# Altium PCB Electrode_PCB.PcbDoc
Units mil, origin at the board's own origin, x right, y up, seen from the top; angles counter-clockwise.
Board outline 510.49 x 1258.83 mil, 2 copper layers (Top Layer, Bottom Layer), stack 34 mil thick; 20 components, 19 nets, 78 pads, 13 vias.
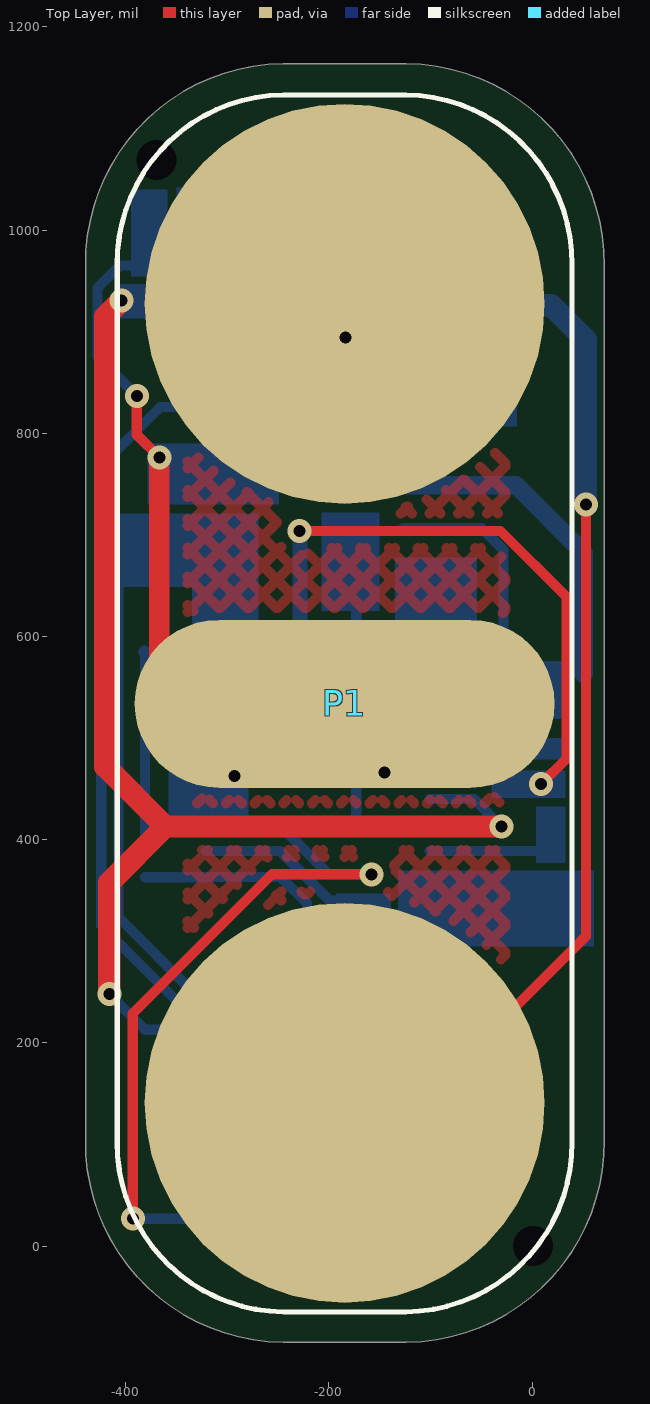
[diagram p0: Top Layer view]
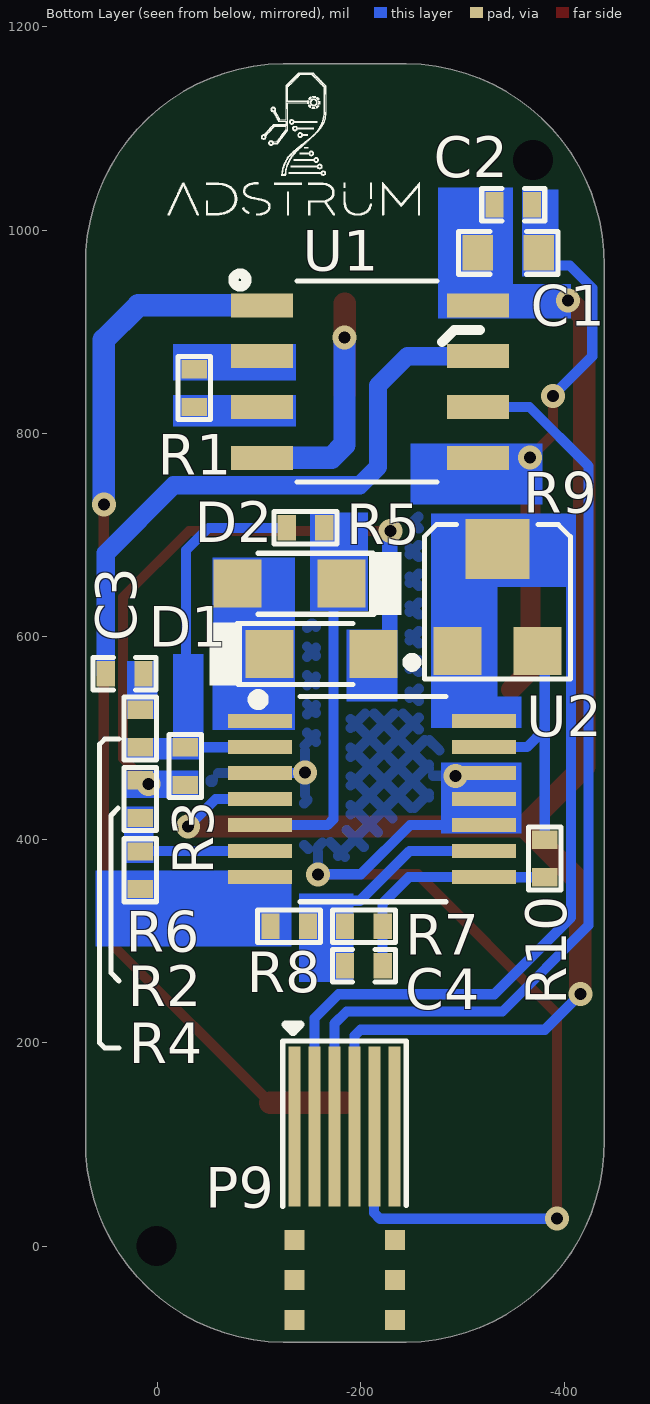
[diagram p1: Bottom Layer view, seen from below]
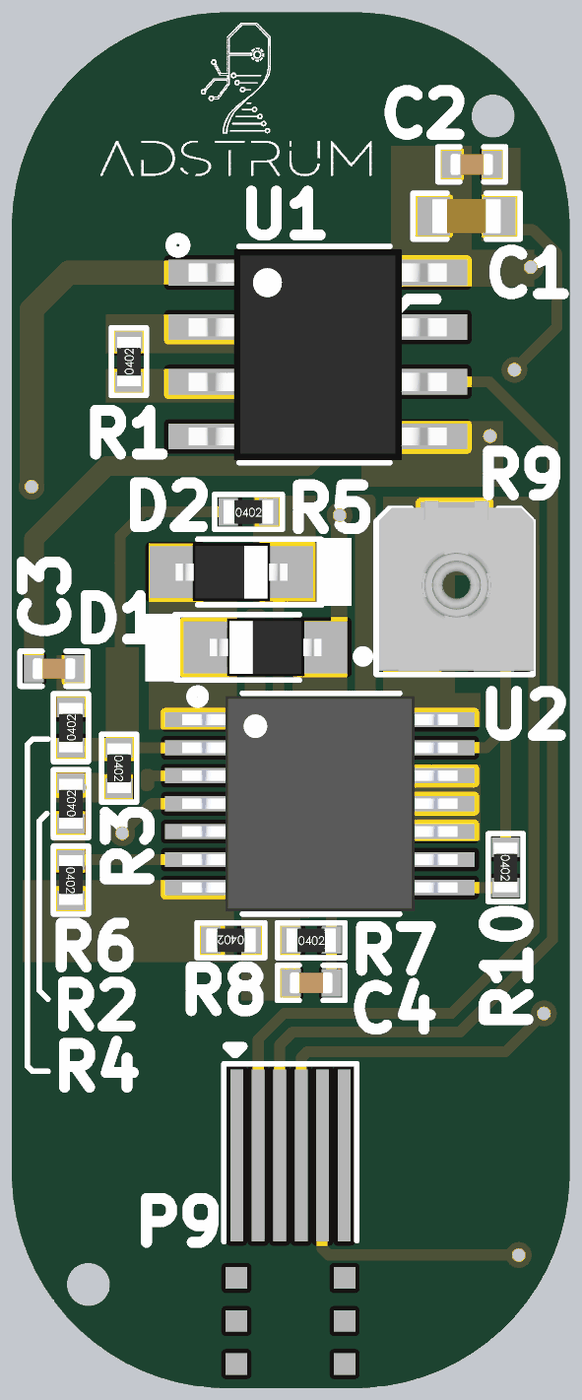
[diagram p2: 3D render of the assembled board from below, using the file's embedded part models]

## Layer stack, top to bottom
Top Solder: solder mask 3, Solder Resist, Dk 3.5
Top Layer: signal copper 9
Dielectric 1: dielectric 16, FR-4, Dk 4.8
Bottom Layer: signal copper 9
Bottom Solder: solder mask 3, Solder Resist, Dk 3.5

## Board outline
-439.51,104.27 ccw(c-242.67,102.06) -244.88,-94.78 -123.65,-94.78 ccw(c-125.86,102.06) 70.98,104.27 70.98,965 ccw(c-125.86,967.21) -123.65,1164.05 -244.88,1164.05 ccw(c-242.67,967.21) -439.51,965

## Design rules (kind name [scope] priority, off if disabled: settings)
Clearance [All] p1: gap=7 ignorepadtopadclearanceinfootprint=FALSE except(0: Arc-Hole Track-Hole SMDPad-Hole THPad-Hole Via-Hole Fill-Hole Poly-Hole Region-Hole Text-Hole; 4: Arc-SMDPad Track-SMDPad SMDPad-SMDPad)
HoleSize [All] p1: absolutevalues=TRUE maxlimit=1000 minlimit=1 maxpercent=80.000 minpercent=20.000
HoleToHoleClearance [All] p1: gap=0 allowstackedmicrovias=TRUE
MinimumSolderMaskSliver [All] p1: minsoldermaskwidth=0
PolygonConnect [All] p1: connectstyle=Relief reliefconductorwidth=10 reliefentries=4 polygonreliefangle="90 Angle" airgapwidth=10
RoutingVias [All] p1: holewidth=11.81 width=23.62 viastyle="Through Hole" minholewidth=11.81 minwidth=23.62 maxholewidth=31.5 maxwidth=62.99
SilkToSilkClearance [All] p1: silktosilkclearance=0
SilkToSolderMaskClearance [IsPad] p1: minsilkscreentomaskgap=0 clearancetoexposedcopper=TRUE
SolderMaskExpansion [All] p1: expansion=4 istentingtop=FALSE
Width [All] p1: maxlimit=40 minlimit=10 preferedwidth=22
25 further rules are at their usual default settings.

## Components (designator, comment, footprint, x,y, rotation, side; value= is the part's Value field where it differs from the comment)
C1 "10uF'" Cap0603 -345.24,977.63 r180 bottom
C2 "0.1uF" "Cap 0402" -350,1025 r180 bottom
C3 "10nF" "Cap 0402" 32.5,563.5 r180 bottom
C4 "1uF" "Cap 0402" -203,276 r0 bottom
D1 "1N4148WS" SOD-323 -161.18,583 r180 bottom
D2 "1N4148WS" SOD-323 -129.98,652 r0 bottom
P1 "sEMG sensor" "sEMG sensor" -184.51,534.27 r0 top locked
P9 "6 pin Ribbon Pads" "6 pin Ribbon Pads." -183.95,118 r0 bottom
R1 "240R" Res0402 -36,844.5 r90 bottom
R2 "150K" Res0402 17,440 r90 bottom
R3 "150K" Res0402 -27,472.5 r270 bottom
R4 "150K" Res0402 17,509.5 r90 bottom
R5 "150K" Res0402 -145.5,707 r180 bottom
R6 "150K" Res0402 17,370 r270 bottom
R7 "80.6K" Res0402 -203,315 r180 bottom
R8 "80.6K" Res0402 -129.5,315 r0 bottom
R9 "TC33X-2-104E" TC33X-2-104E -295,586 r180 bottom
R10 "1K" Res0402 -381,381.5 r270 bottom
U1 "AD8221ARZ-R7" SOIC-8 -209,851 r180 bottom
U2 "TL084CPWR" 14TSSOP -211,440 r180 bottom locked

## Footprints (in the part's own frame and the unit in brackets; to place one, negate y for a bottom-side part, rotate by r counter-clockwise, add the part's x,y. Pads: shape width x height; smd on the part's side, far side on the other; paste and mask are expansions set on the pad)
"6 pin Ribbon Pads." [mm]
  rect 0.3x4 smd: 1(1.25,0) 2(0.75,0) 3(0.25,0) 4(-0.25,0) 5(-0.75,0) 6(-1.25,0)
  silkscreen extent -1.54,-2.54 1.54,2.01
14TSSOP [mm]
  rect 1.6x0.35 smd: 1(-2.8,1.95) 2(-2.8,1.3) 3(-2.8,0.65) 4(-2.8,0) 5(-2.8,-0.65) 6(-2.8,-1.3) 7(-2.8,-1.95) 8(2.8,-1.95) 9(2.8,-1.3) 10(2.8,-0.65) 11(2.8,0) 12(2.8,0.65) 13(2.8,1.3) 14(2.8,1.95)
  silkscreen extent -2.98,-2.57 1.85,2.63, body extent -3.2,-2.5 3.2,2.5, height 1.2
Cap0603 [mil]
  rect 30x35 smd mask+2.36: 1(-30,0) 2(30,0)
  silkscreen extent -49,-21 49,21, body extent -32,-16 31,16, height 34
"Cap 0402" [mil]
  rect 18x25 smd mask+2.36: 1(-18.5,0) 2(18.5,0)
  silkscreen extent -31,-16 31,16, body extent -20,-10 20,10, height 19
Res0402 [mil]
  rect 18x25 smd mask+4: 1(-18.5,0) 2(18.5,0)
  silkscreen extent -32,-17 32,16, body extent -23,-11 23,11, height 16
"sEMG sensor" [mm]
  round 10 smd: 1(0,9.987) 2(0,-9.987)
  oval 10.5x4.2 smd: 3(0,-0.013)
  silkscreen extent -5.68,-15.21 5.68,15.21
SOD-323 [mm]
  rect 1.2x1.2 smd: 1(-1.3,0) 2(1.3,0)
  silkscreen extent -2.79,-0.79 0.79,0.79, body extent -1.3,-0.67 1.3,0.67, height 1.1
SOIC-8 [mm]
  rect 1.55x0.6 smd: 1(-2.7,1.905) 2(-2.7,0.635) 3(-2.7,-0.635) 4(-2.7,-1.905) 5(2.7,-1.905) 6(2.7,-0.635) 7(2.7,0.635) 8(2.7,1.905)
  silkscreen extent -3.41,-2.51 1.68,2.7, body extent -3,-2.45 3,2.45, height 1.7
TC33X-2-104E [mm]
  rect 1.2x1.2 smd: 1(0,0) 3(2,0)
  rect 1.6x1.5 smd: 2(1,2.55)
  silkscreen extent -1.24,-0.71 2.83,3.15, body extent -0.76,-0.64 2.84,3.32, height 1.13

## Part data
C1: library part CL10A106MA8NRNC, "CAP CER 10UF 25V X5R 0603", Capacitance=10uF, Case Code (Imperial)=0603, Case Code (Metric)=1608, Dielectric=X5R, Manufacturer=Samsung, Max Operating Temperature=85°C, Min Operating Temperature=-55°C, Package Quantity=1, Tolerance=20%, Voltage Rating=25V, Case/Package=0603, Category="Ceramic Capacitors", ComponentLink1Description=https://datasheet.ciiva.com/25766/cl10a106ma8nrnc-25766562.pdf?src-supplier=Digi-Key, ComponentLink1URL=https://datasheet.ciiva.com/25766/cl10a106ma8nrnc-25766562.pdf?src-supplier=Digi-Key, Construction=Flat, Contact Plating=Tin, Lead Free="Lead Free", Length=0.063inch, Manufacturer Part Number=CL10A106MA8NRNC, Mount="Surface Mount", Packaging="Tape and Reel", Pricing 1="4000=0.03753, 8000=0.03700, 16000=0.03595, 24000=0.03515, 32000=0.03383, 40000=0.03304, 400000=0.03225 (USD)", RoHS=Yes, RoHS Compliant=Yes, Series=CL, Supplier 1=Avnet, Supplier Part Number 1=CL10A106MA8NRNC, Termination=Wraparound, Thickness=0.035inch, Width=0.031inch
C2: library part GRM155R71H104ME14D, "CAP CER 0.1UF 50V X7R 0402", Capacitance=100nF, Case/Package=0402, Manufacturer=Murata, Max Operating Temperature=125°C, Min Operating Temperature=-55°C, Supplier Part Number 1=490-10701-1-ND, Tolerance=20%, Voltage Rating=50V, ComponentLink1Description=http://search.murata.co.jp/Ceramy/image/img/A01X/G101/ENG/GRM155R71H104ME14-01.pdf?src-supplier=Digi-Key, ComponentLink1URL=http://search.murata.co.jp/Ceramy/image/img/A01X/G101/ENG/GRM155R71H104ME14-01.pdf?src-supplier=Digi-Key, ComponentLink2Description=http://psearch.en.murata.com/capacitor/product/GRM155R71H104ME14%23.pdf?src-supplier=Avnet, ComponentLink2URL=http://psearch.en.murata.com/capacitor/product/GRM155R71H104ME14%23.pdf?src-supplier=Avnet, ComponentLink3Description=http://components.arrow.com/part/dataview/0323_07177683?src-supplier=Arrow+Europe, ComponentLink3URL=http://components.arrow.com/part/dataview/0323_07177683?src-supplier=Arrow+Europe, ComponentLink4Description=http://www.mouser.com/ds/2/281/c02e-2905.pdf?src-supplier=Mouser, ComponentLink4URL=http://www.mouser.com/ds/2/281/c02e-2905.pdf?src-supplier=Mouser, Length=0.039inch, Manufacturer Part Number=GRM155R71H104ME14D, Mount="Surface Mount", Packaging="Cut Tape", Pricing 1="1=0.1, 10=0.038, 100=0.0168, 500=0.01198, 1000=0.00941, 2500=0.00855, 5000=0.00787 (USD)", Stock 1=439844, Supplier 1=Digi-Key, Thickness=0.022inch, Width=0.02inch
C3: library part CC0402KRX7R9BB103, "CAP CER 10nF 50V 0402 SMD", Supplier 1="Arrow Electronics", Supplier Part Number 1=CC0402KRX7R9BB103
C4: library part CC0402KRX5R7BB105, "CAP CER 1UF 16V X5R 0402", Case Code (Imperial)=0402, Case Code (Metric)=1005, Dielectric=X5R, Manufacturer=Yageo, Max Operating Temperature=85°C, Min Operating Temperature=-55°C, Supplier Part Number 1=311-1691-6-ND, Tolerance=10%, Voltage Rating=16V, Capacitance=1uF, Case/Package=0402, ComponentLink1Description=http://www.yageo.com/documents/recent/UPY-GPHC_X5R_4V-to-50V_12.pdf?src-supplier=Avnet+Europe, ComponentLink1URL=http://www.yageo.com/documents/recent/UPY-GPHC_X5R_4V-to-50V_12.pdf?src-supplier=Avnet+Europe, Composition=Ceramic, Depth=0.5mm, Halogen Free="Halogen Free", Height=0.5mm, Lead Free="Lead Free", Length=1mm, Manufacturer Part Number=CC0402KRX5R7BB105, Mount="Surface Mount", Packaging="Tape and Reel", Pricing 1="1=0.36, 10=0.252, 100=0.1512, 500=0.1134, 1000=0.09576, 2500=0.09072, 5000=0.08568 (USD)", Radiation Hardening=No, Stock 1=1405667, Supplier 1=Digi-Key, Termination=SMD/SMT, Thickness=0.022inch, Voltage Rating (DC)=16V, Weight=2.3E-05oz, Width=0.02inch
D1 D2: "100V -55℃~+150℃@(Tj) 400mW Single 1.25V@150mA 4ns 1μA@75V 200mA SOD-323 Switching Diode ROHS", Manufacturer=YFW, ComponentLink1Description=LCSC, ComponentLink1URL=https://lcsc.com/product-detail/Switching-Diode_YFW-1N4148WS_C1884546.html, Manufacturer Part Number=1N4148WS
P1: "Sensor Connecting Pads"
P9: "Ribbon wire Connection Pads"
R1: library part RC0402FR-07240RL, "RES SMD 0402 240 Ohm 1% 1/16W ±100ppm/°C Molded SMD Paper T/R", Case Code (Imperial)=0402, Case Code (Metric)=1005, Manufacturer=Yageo, Max Operating Temperature=155°C, Max Power Dissipation=63mW, Min Operating Temperature=-55°C, Package Quantity=1, Resistance Tolerance=1%, Resistor Type="Thick Film", Temperature Coefficient=100ppm/°C, Voltage Rating=50V, Case/Package=0402, Category="Chip SMD Resistors", ComponentLink1Description=https://datasheet.ciiva.com/7849/1018594-7849915.pdf?src-supplier=Element14, ComponentLink1URL=https://datasheet.ciiva.com/7849/1018594-7849915.pdf?src-supplier=Element14, ComponentLink2Description=https://datasheet.ciiva.com/7849/1018594-7849916.pdf?src-supplier=Element14, ComponentLink2URL=https://datasheet.ciiva.com/7849/1018594-7849916.pdf?src-supplier=Element14, ComponentLink3Description=https://datasheet.ciiva.com/2519/pyu-r-int-thick-7-2519157.pdf?src-supplier=Digi-Key, ComponentLink3URL=https://datasheet.ciiva.com/2519/pyu-r-int-thick-7-2519157.pdf?src-supplier=Digi-Key, ComponentLink4Description=https://datasheet.ciiva.com/2519/pyu-r-int-thick-7-2519158.pdf?src-supplier=Digi-Key, ComponentLink4URL=https://datasheet.ciiva.com/2519/pyu-r-int-thick-7-2519158.pdf?src-supplier=Digi-Key, ComponentLink5Description=https://datasheet.ciiva.com/2519/pyu-r-int-thick-7-2519156.pdf?src-supplier=Digi-Key, ComponentLink5URL=https://datasheet.ciiva.com/2519/pyu-r-int-thick-7-2519156.pdf?src-supplier=Digi-Key, ComponentLink6Description=https://datasheet.ciiva.com/12669/pyu-rc0402-51-rohs-l-6-r-12669689.pdf?src-supplier=Mouser, ComponentLink6URL=https://datasheet.ciiva.com/12669/pyu-rc0402-51-rohs-l-6-r-12669689.pdf?src-supplier=Mouser, ComponentLink7Description=https://datasheet.ciiva.com/17419/pyu-rc0402-51-rohs-l-6-r-17419482.pdf?src-supplier=Future+Electronics, ComponentLink7URL=https://datasheet.ciiva.com/17419/pyu-rc0402-51-rohs-l-6-r-17419482.pdf?src-supplier=Future+Electronics, Construction=Rectangular, Depth=0.5mm, Features="Moisture Resistant", Height=0.016inch, Lead Free="Lead Free", Length=1mm, Manufacturer Part Number=RC0402FR-07240RL, Military Standard=Not, Number of Terminations=2, Packaging="Tape and Reel", Power Rating=63mW, Pricing 1="10000=0.00190 (USD)", REACH SVHC=Unknown, Resistance=240R, RoHS=Yes, RoHS Compliant=Yes, Series=RC, Size Code=0402, Stock 1=3138480, Supplier 1="Arrow Electronics", Supplier Part Number 1=RC0402FR-07240RL, Termination=SMD/SMT, Tolerance=1%, Voltage Rating (DC)=50V, Width=0.02inch
R2 R3 R4 R5 R6: library part RC0402JR-07150KL, "RES SMD 0402 150kOhm 5% Paper T/R", Case Code (Imperial)=0402, Case Code (Metric)=1005, Manufacturer=Yageo, Max Operating Temperature=155°C, Max Power Dissipation=63mW, Min Operating Temperature=-55°C, Package Quantity=1, Resistance=150kR, Resistance Tolerance=5%, Resistor Type="Thick Film", Temperature Coefficient=100ppm/°C, Voltage Rating=50V, Case/Package=0402, Category="Chip SMD Resistors", ComponentLink1Description=https://datasheet.ciiva.com/7983/1018594-7983551.pdf?src-supplier=Element14, ComponentLink1URL=https://datasheet.ciiva.com/7983/1018594-7983551.pdf?src-supplier=Element14, ComponentLink2Description=https://datasheet.ciiva.com/2518/pyu-r-int-thick-7-2518929.pdf?src-supplier=Digi-Key, ComponentLink2URL=https://datasheet.ciiva.com/2518/pyu-r-int-thick-7-2518929.pdf?src-supplier=Digi-Key, ComponentLink3Description=https://datasheet.ciiva.com/2518/pyu-r-int-thick-7-2518930.pdf?src-supplier=Digi-Key, ComponentLink3URL=https://datasheet.ciiva.com/2518/pyu-r-int-thick-7-2518930.pdf?src-supplier=Digi-Key, ComponentLink4Description=https://datasheet.ciiva.com/2518/pyu-r-int-thick-7-2518928.pdf?src-supplier=Digi-Key, ComponentLink4URL=https://datasheet.ciiva.com/2518/pyu-r-int-thick-7-2518928.pdf?src-supplier=Digi-Key, ComponentLink5Description=https://datasheet.ciiva.com/7850/1018594-7850149.pdf?src-supplier=Element14, ComponentLink5URL=https://datasheet.ciiva.com/7850/1018594-7850149.pdf?src-supplier=Element14, ComponentLink6Description=https://datasheet.ciiva.com/17072/pyu-rc0402-51-rohs-l-6-r-17072379.pdf?src-supplier=Future+Electronics, ComponentLink6URL=https://datasheet.ciiva.com/17072/pyu-rc0402-51-rohs-l-6-r-17072379.pdf?src-supplier=Future+Electronics, ComponentLink7Description=https://datasheet.ciiva.com/15189/getdatasheetpartid-251830-15189543.pdf?src-supplier=Verical, ComponentLink7URL=https://datasheet.ciiva.com/15189/getdatasheetpartid-251830-15189543.pdf?src-supplier=Verical, Construction=Rectangular, Depth=0.5mm, Features="Moisture Resistant", Height=0.016inch, Lead Free="Lead Free", Length=1mm, Manufacturer Part Number=RC0402JR-07150KL, Military Standard=Not, Number of Terminations=2, Packaging="Tape and Reel", Power Rating=63mW, Pricing 1="10000=0.00100 (USD)", REACH SVHC="No SVHC", RoHS=Yes, RoHS Compliant=Yes, Series=RC, Size Code=0402, Stock 1=170000, Supplier 1="Arrow Electronics", Supplier Part Number 1=RC0402JR-07150KL, Termination=SMD/SMT, Tolerance=5%, Weight=2.3E-05oz, Width=0.02inch
R7 R8: library part RC-02W8062FT, "1/16W 50V ±1% ±200ppm/℃ -55℃~+155℃ 80.6kΩ 0402 Chip Resistor - Surface Mount ROHS", Manufacturer=FH, Manufacture Part Number=RC-02W8062FT
R9: "TRIMMER 100K OHM 0.1W J LEAD TOP", Color=Silver, Manufacturer=Bourns, Max Operating Temperature=100°C, Max Power Dissipation=100mW, Min Operating Temperature=-40°C, Package Quantity=2500, Resistance=100kR, Resistance Tolerance=25%, Resistor Type=Carbon,Cermet, Temperature Coefficient=250ppm/°C, Voltage Rating (DC)=50V, Category="Variable Resistors and Potentiometers", ComponentLink1Description=https://datasheet.ciiva.com/11832/0900766b802749b3-11832506.pdf?src-supplier=RSComponents, ComponentLink1URL=https://datasheet.ciiva.com/11832/0900766b802749b3-11832506.pdf?src-supplier=RSComponents, ComponentLink2Description=https://datasheet.ciiva.com/8700/tc33-8700395.pdf?src-supplier=Avnet, ComponentLink2URL=https://datasheet.ciiva.com/8700/tc33-8700395.pdf?src-supplier=Avnet, ComponentLink3Description=https://datasheet.ciiva.com/2155/tc33-2155965.pdf?src-supplier=Digi-Key, ComponentLink3URL=https://datasheet.ciiva.com/2155/tc33-2155965.pdf?src-supplier=Digi-Key, ComponentLink4Description=https://datasheet.ciiva.com/7953/1818686-7953181.pdf?src-supplier=Element14, ComponentLink4URL=https://datasheet.ciiva.com/7953/1818686-7953181.pdf?src-supplier=Element14, ComponentLink5Description=https://datasheet.ciiva.com/16716/70155234-16716301.pdf?src-supplier=Allied+Electronics, ComponentLink5URL=https://datasheet.ciiva.com/16716/70155234-16716301.pdf?src-supplier=Allied+Electronics, ComponentLink6Description=https://datasheet.ciiva.com/2155/tc33-2155966.pdf?src-supplier=Digi-Key, ComponentLink6URL=https://datasheet.ciiva.com/2155/tc33-2155966.pdf?src-supplier=Digi-Key, ComponentLink7Description=https://datasheet.ciiva.com/7953/1818686-7953182.pdf?src-supplier=Element14, ComponentLink7URL=https://datasheet.ciiva.com/7953/1818686-7953182.pdf?src-supplier=Element14, ComponentLink8Description=https://datasheet.ciiva.com/2155/tc33-2155967.pdf?src-supplier=Digi-Key, ComponentLink8URL=https://datasheet.ciiva.com/2155/tc33-2155967.pdf?src-supplier=Digi-Key, Depth=3.8mm, Height=0.047inch, Length=3mm, Manufacturer Part Number=TC33X-2-104E, Military Standard=Not, Mount="Surface Mount", Number of Turns=1, Packaging="Tape and Reel", Power Rating=100mW, Pricing 1="2500=0.15500, 5000=0.13130 (USD)", Radiation Hardening=No, REACH SVHC="No SVHC", RoHS=Yes, RoHS Compliant=Yes, Series=TC33, Stock 1=12500, Supplier 1="Arrow Electronics", Supplier Part Number 1=TC33X-2-104E, Termination="Foot Print", Tolerance=25%, Weight=29.4mg, Width=0.118inch
R10: library part RC0402JR-071KL, "RES 1K OHM 5% 1/16W 0402", Case Code (Imperial)=0402, Case Code (Metric)=1005, Manufacturer=Yageo, Max Operating Temperature=155°C, Max Power Dissipation=63mW, Min Operating Temperature=-55°C, Package Quantity=1, Power Rating=62.5mW, Resistance=1kR, Resistance Tolerance=5%, Resistor Type="Thick Film", Supplier Part Number 1=311-1.0KJRCT-ND, Temperature Coefficient=100ppm/°C, Voltage Rating=50V, Case/Package=0402, Category="Chip SMD Resistors", ComponentLink1Description=https://datasheet.ciiva.com/7983/1018594-7983558.pdf?src-supplier=Element14, ComponentLink1URL=https://datasheet.ciiva.com/7983/1018594-7983558.pdf?src-supplier=Element14, ComponentLink2Description=https://datasheet.ciiva.com/2452/pyu-r-int-thick-7-2452756.pdf?src-supplier=Digi-Key, ComponentLink2URL=https://datasheet.ciiva.com/2452/pyu-r-int-thick-7-2452756.pdf?src-supplier=Digi-Key, ComponentLink3Description=https://datasheet.ciiva.com/2452/pyu-r-int-thick-7-2452757.pdf?src-supplier=Digi-Key, ComponentLink3URL=https://datasheet.ciiva.com/2452/pyu-r-int-thick-7-2452757.pdf?src-supplier=Digi-Key, ComponentLink4Description=https://datasheet.ciiva.com/2452/pyu-r-int-thick-7-2452755.pdf?src-supplier=Digi-Key, ComponentLink4URL=https://datasheet.ciiva.com/2452/pyu-r-int-thick-7-2452755.pdf?src-supplier=Digi-Key, ComponentLink5Description=https://datasheet.ciiva.com/7850/1018594-7850170.pdf?src-supplier=Element14, ComponentLink5URL=https://datasheet.ciiva.com/7850/1018594-7850170.pdf?src-supplier=Element14, ComponentLink6Description=https://datasheet.ciiva.com/7850/1018594-7850171.pdf?src-supplier=Element14, ComponentLink6URL=https://datasheet.ciiva.com/7850/1018594-7850171.pdf?src-supplier=Element14, ComponentLink7Description=https://datasheet.ciiva.com/17081/pyu-rc0402-51-rohs-l-6-r-17081438.pdf?src-supplier=Future+Electronics, ComponentLink7URL=https://datasheet.ciiva.com/17081/pyu-rc0402-51-rohs-l-6-r-17081438.pdf?src-supplier=Future+Electronics, Construction=Rectangular, Depth=0.5mm, Features="Moisture Resistant", Height=0.016inch, Lead Free="Lead Free", Length=0.039inch, Manufacturer Part Number=RC0402JR-071KL, Military Standard=Not, Number of Terminations=2, Packaging="Tape and Reel", Pricing 1="1=0.10000, 10=0.01300, 100=0.00540, 1000=0.00244, 2500=0.00212, 5000=0.00175 (USD)", REACH SVHC="No SVHC", RoHS=Yes, RoHS Compliant=Yes, Series=RC, Size Code=0402, Stock 1=452315, Supplier 1=Digi-Key, Termination=SMD/SMT, Tolerance=5%, Width=0.02inch
U1: "IC OPAMP INSTR 825KHZ 8SOIC", Case/Package=SOIC, Input Bias Current=1.5nA, Input Offset Voltage (Vos)=60uV, Input Resistance=100GR, Manufacturer="Analog Devices", Max Dual Supply Voltage=18V, Max Operating Temperature=85°C, Max Power Dissipation=200mW, Min Dual Supply Voltage=2.3V, Min Operating Temperature=-40°C, Nominal Supply Current=1mA, Operating Supply Voltage=36V, Output Current per Channel=18mA, Package Quantity=1000, Power Supply Rejection Ratio (PSRR)=130dB, Quiescent Current=900uA, Supplier Part Number 1=584-AD8221ARZ-R7, Voltage Gain=60dB, -3db Bandwidth=825kHz, Bandwidth=562kHz, Category="Amplifiers - Op Amps, Buffer, Instrumentation", Common Mode Rejection Ratio=80dB, ComponentLink1Description=https://datasheet.ciiva.com/15128/getdatasheetpartid-313520-15128733.pdf?src-supplier=Verical, ComponentLink1URL=https://datasheet.ciiva.com/15128/getdatasheetpartid-313520-15128733.pdf?src-supplier=Verical, ComponentLink2Description=https://datasheet.ciiva.com/2975/ad8221-2975658.pdf?src-supplier=Avnet, ComponentLink2URL=https://datasheet.ciiva.com/2975/ad8221-2975658.pdf?src-supplier=Avnet, ComponentLink3Description=https://datasheet.ciiva.com/2975/ad8221-2975980.pdf?src-supplier=Avnet, ComponentLink3URL=https://datasheet.ciiva.com/2975/ad8221-2975980.pdf?src-supplier=Avnet, ComponentLink4Description=https://datasheet.ciiva.com/6628/ad8221-6628618.pdf?src-supplier=Digi-Key, ComponentLink4URL=https://datasheet.ciiva.com/6628/ad8221-6628618.pdf?src-supplier=Digi-Key, ComponentLink5Description=https://datasheet.ciiva.com/6628/ad8221-6628619.pdf?src-supplier=Digi-Key, ComponentLink5URL=https://datasheet.ciiva.com/6628/ad8221-6628619.pdf?src-supplier=Digi-Key, ComponentLink6Description=https://datasheet.ciiva.com/6628/ad8221-6628617.pdf?src-supplier=Digi-Key, ComponentLink6URL=https://datasheet.ciiva.com/6628/ad8221-6628617.pdf?src-supplier=Digi-Key, ComponentLink7Description=https://datasheet.ciiva.com/48709/001249009-da-01-en-ic-amp-inst-prec-ad8221arz-r7-soic-8-adi-48709526.pdf?src-supplier=Conrad, ComponentLink7URL=https://datasheet.ciiva.com/48709/001249009-da-01-en-ic-amp-inst-prec-ad8221arz-r7-soic-8-adi-48709526.pdf?src-supplier=Conrad, Contact Plating=Tin,Matte, Lead Free="Contains Lead", Manufacturer Part Number=AD8221ARZ-R7, Number of Channels=1, Number of Circuits=1, Number of Elements=1, Number of Pins=8, Operating Supply Current=1mA, Packaging="Tape and Reel", Power Dissipation=200mW, Pricing 1="1=7.37000, 10=6.66000, 25=6.35000, 50=6.35000, 100=5.51000, 250=5.27000, 500=4.80000, 1000=4.37000, 10000=4.37000 (USD)", Radiation Hardening=No, RoHS=Yes, RoHS Compliant=Yes, Series=-, Slew Rate=2.5V/µs, Supplier 1=Mouser, Supply Current=1mA
U2: "IC OPAMP JFET 4 CIRCUIT 14TSSOP", Case/Package=TSSOP, Input Bias Current=400pA, Input Offset Voltage (Vos)=15mV, Manufacturer="Texas Instruments", Max Dual Supply Voltage=18V, Max Operating Temperature=125°C, Max Power Dissipation=680mW, Min Dual Supply Voltage=3.5V, Min Operating Temperature=-40°C, Min Supply Voltage=7V, Nominal Supply Current=11.2mA, Operating Supply Current=1.4mA, Package Quantity=1, Quiescent Current=2.8A, Supplier Part Number 1=595-TL084CPWR, Voltage Gain=106.02dB, Bandwidth=3MHz, Category="Amplifiers - Op Amps, Buffer, Instrumentation", Common Mode Rejection Ratio=70dB, ComponentLink1Description=https://datasheet.ciiva.com/34301/1064719-34301936.pdf?src-supplier=Jameco, ComponentLink1URL=https://datasheet.ciiva.com/34301/1064719-34301936.pdf?src-supplier=Jameco, ComponentLink2Description=https://datasheet.ciiva.com/1795/tl081a-1795644.pdf?src-supplier=Digi-Key, ComponentLink2URL=https://datasheet.ciiva.com/1795/tl081a-1795644.pdf?src-supplier=Digi-Key, ComponentLink3Description=https://datasheet.ciiva.com/1795/tl081a-1795643.pdf?src-supplier=Digi-Key, ComponentLink3URL=https://datasheet.ciiva.com/1795/tl081a-1795643.pdf?src-supplier=Digi-Key, ComponentLink4Description=https://datasheet.ciiva.com/1795/tl081a-1795645.pdf?src-supplier=Digi-Key, ComponentLink4URL=https://datasheet.ciiva.com/1795/tl081a-1795645.pdf?src-supplier=Digi-Key, ComponentLink5Description=https://datasheet.ciiva.com/14459/tl082-14459749.pdf?src-supplier=Avnet, ComponentLink5URL=https://datasheet.ciiva.com/14459/tl082-14459749.pdf?src-supplier=Avnet, ComponentLink6Description=https://datasheet.ciiva.com/48707/001072249-da-01-en-ic-opamp-jfet-3mh-tl084cpwr-tssop-14-tid-48707867.pdf?src-supplier=Conrad, ComponentLink6URL=https://datasheet.ciiva.com/48707/001072249-da-01-en-ic-opamp-jfet-3mh-tl084cpwr-tssop-14-tid-48707867.pdf?src-supplier=Conrad, Contact Plating=Gold, Gain Bandwidth Product=3MHz, Lead Free="Lead Free", Manufacturer Part Number=TL084CPWR, Max I/O Voltage=15mV, Max Supply Voltage=18V, Nominal Gain Bandwidth Product=3MHz, Number of Amplifiers=4, Number of Channels=4, Number of Circuits=4, Number of Elements=4, Number of Pins=14, Packaging="Tape and Reel", Pricing 1="1=0.64000, 10=0.54500, 50=0.54500, 100=0.37800, 500=0.32000, 1000=0.24700, 2000=0.22500, 10000=0.22500 (USD)", Radiation Hardening=No, REACH SVHC="No SVHC", RoHS=Yes, RoHS Compliant=Yes, Slew Rate=13V/µs, Stock 1=3, Supplier 1=Mouser, Unity Gain Bandwidth Product=3MHz

## Free pads (board coordinates)
  round 0 hole 39.37 unplated: MH1(-369.51,1069.27) MH2(0.98,0)
  rect 19.68x19.68 smd far side: ""(-233.53,-72.79) ""(-233.53,-72.79) ""(-233.53,-33.42) ""(-233.53,-33.42) ""(-233.53,5.95) ""(-233.53,5.95) ""(-134.53,-72.79) ""(-134.53,-72.79) ""(-134.53,-33.42) ""(-134.53,-33.42) ""(-134.53,5.95) ""(-134.53,5.95)

## Via types
v1: diameter 23.62, hole 11.81, Top Layer to Bottom Layer, tented both sides, 13 vias

## Nets (pads, with @x,y where several pads share a name; then routed paths per layer and width w, separated by ;. In a path a pad name is that pad's centre, name@x,y a point inside that pad or via, vN(x,y) a via of type N, cw(c..) or ccw(c..) an arc to the next point about the centre after c; other vN are vias at no path point)
#rg: R1.2 U1.2
*rg: R1.1 U1.3
END: P1.1 U1.4 | length 281.2
  Top Layer w22: P1.1@-184.27,927.83 -184.27,839.27 P1.1@-184,839
  Bottom Layer w22: v1(-183.74,894.37) -184,894.1 -184,788.89 -171.11,776 U1.4
GND: C1.2 C2.2 P1.3 P9.5 U1.5 U2.3 U2.10 U2.11 U2.12 | length 1591.1
  Top Layer w10: v1(-393,27) -393,229 -256,366 v1(-158,366) ; v1(-389,837) -389,798.63 v1(-366.74,776.37)
  Top Layer w20: v1@-367,776.37 -367,626.37 -367,567 P1.3@-348,548
  Bottom Layer w10: v1(-393,27) -218.74,27 -212.98,32.76 P9.5@-212.98,117.39 ; v1(-389,837) -427.81,875.81 -427.81,943.16 -405.84,965.13 -385.24,965.13 -375.24,975.13 C1.2 ; U2.11@-322.24,441 U2.11 ; U2.10 -248.41,414.41 -200,366 v1(-158,366) ; U2.11@-316.89,441 -302.95,454.95 ; U2.11@-301.12,442.12 U2.11@-301,442 ; v1@-299.19,458.7 -314.35,458.7 U2.12 -295.59,465.59 v1(-293,463) ; U2.12@-298.89,462.29 -295.31,458.7 -301,453 U2.11@-301,442 ; U2.11@-297.11,438.11 U2.11@-301,442 ; P9.5@-213.98,117.39 P9.5@-213.37,118 ; v1(-145,466) -144.8,465.8 -100.97,465.8 U2.3
IN2N: R2.1 R6.1 U2.6 | length 117.8
  Bottom Layer w10: U2.6 R6.1@17,388.82
IN2P: D2.1 R5.2 U2.5 | length 309.8
  Bottom Layer w10: D2.1 -173,643.83 -173,420.27 -167.14,414.41 U2.5
Measure: P9.2 R9.1 R9.2 U2.14 | length 755.3
  Bottom Layer w10: -407,676 -407,323.63 -331.37,248 -178,248 -154.47,224.47 P9.2@-154.47,118 ; -276,519 -274,517
Measure#: C3.1 U1.7 | length 612
  Bottom Layer w18: U1.7 -246,876 -217,847 -217,767 -199,749 -16,749 51,682 C3.1
MID: P1.2 U1.1 | length 1062.2
  Top Layer w10: P1.2@-110.93,141.07 42,294 53,305 v1(53,730)
  Top Layer w22: P1.2 P1.2@-110.93,141.07
  Bottom Layer w22: U1.1 19,926 53,892 v1(53,730)
NetC3_2: C3.2 R4.2
NetC4_2: C4.2 R7.1 R8.1 U2.9 | length 226.5
  Bottom Layer w10: U2.9 -247.82,388.82 -199,340 -161,340 -158,337 ; R7.1@-188,318.5 R7.1 ; -173.5,276 -173.5,301.5 ; -172.25,302.75 -166,296.5 -166,294
NetD1_2: D1.2 R2.2 R3.2 | length 646
  Top Layer w10: v1(-229,704) -31,704 34,639 34,480 v1(9,455)
  Bottom Layer w10: R3.2@-32,454 -12,454 -11.15,453.15 v1@-1,453.15
  Bottom Layer w15: v1(-229,704) -228.48,703.48 -228.48,599.12 D1.2 D1.2@-212.74,582.63 ; R2.2@8,453.5 8,454 v1(9,455)
NetR3_1: R3.1 R4.1 R5.1 U2.2 | length 307.9
  Bottom Layer w10: R5.1 -50,707 -28,685 -28,556 ; U2.2 -100.67,491.09 -40.09,491.09 -40,491 ; R3.1@-32,491 R3.1@-25,484
NetR9_3: R9.3 R10.1 U2.13 | length 257.8
  Bottom Layer w10: R9.3@-383,584.74 R9.3@-381.74,586 ; R10.1 -381,508.63 ; R9.3 -381,578.74 -381,508.63 ; U2.13 -363.55,491.18 -381,508.63
OUT1: D1.1 D2.2 U2.1
RECT: R6.2 R8.2 U2.7
SMOOTH: C4.1 R7.2 R10.2 U2.8 | length 231.8
  Bottom Layer w10: R10.2 -380.89,363.11 -321.35,363.11 U2.8 -247.23,363.23 -221.5,337.5 C4.1
VCC_3V3: C1.1 C2.1 P9.4 U1.8 U2.4 | length 1478.1
  Top Layer w22: v1(-416,248) -416,358 -361,413 ; v1(-404,931) -420,915 -420,472 -361,413 ; v1(-30,413) -361,413
  Bottom Layer w10: v1(-416,248) -381,213 -199.65,213 -193.79,207.14 P9.4 ; U2.4 -57,440 v1(-30,413)
VREF: P9.3 U1.6 | length 976.1
  Bottom Layer w10: U1.6 -366,826 -424,768 -424,315.63 -339.37,231 -186,231 -174,219 P9.3@-174,118
pads on no net: P9.1 P9.6

## Polygon pours and split planes (outlines as drawn)
GND on Bottom Layer "GND_L02_P000" (hatched 45Degree grid 20 track 10, remove dead copper, pour order 0): -339.26,962.63 -339.26,102.63 -26.26,102.63 -26.26,962.63
no net on Top Layer "NONET_L01_P001" (hatched 45Degree grid 20 track 10, remove dead copper, pour order 1): -339.26,962.63 -339.26,102.63 -26.26,102.63 -26.26,962.63

## Other copper
Bottom Layer:
  rectangle net IN2N: 4,377 33,433
  rectangle net NetD1_2: -40,441 33,468
  rectangle net NetR3_1: -32,479 32,500
  rectangle net NetC3_2: 0,519 30,576
  rectangle net GND: -394.74,954.37 -358.74,1040
  rectangle net VCC_3V3: -407,913 -276,947
  rectangle net VCC_3V3: -350,913 -276,1042
  rectangle net GND: -378.74,730 -249,790
  rectangle net NetC4_2: -193,260 -139,347
  rectangle net *rg: -136,807 -15,838
  rectangle net #rg: -136,852 -15,888
  rectangle net GND: -358,406 -279,476
  rectangle net RECT: 29,296 60,344
  rectangle net Measure: -411.74,649 -307,721
  rectangle net Measure: -358,510 -278,541
  rectangle net Measure: -334.74,510 -269,721
  rectangle net RECT: -132,295 61,370
  rectangle net OUT1: -135,508 -54,678
  rectangle net IN2P: -207,625 -150,722
  rectangle net NetR3_1: -45,479 -15,583
  rectangle net NetD1_2: -236,536 -186,607

## Silkscreen, mask and mechanical layers (free items; w line width, h text height)
Bottom Overlay:
  drawing of 2578 lines, arcs and shapes, not listed
Mechanical 2:
  lines w10: -439.51,104.27 ccw(c-242.67,102.06) -244.88,-94.78 -123.65,-94.78 ccw(c-125.86,102.06) 70.98,104.27 70.98,965 ccw(c-125.86,967.21) -123.65,1164.05 -244.88,1164.05 ccw(c-242.67,967.21) -439.51,965 ; -439.51,104.27 -439.51,965 ; -439.51,104.27 -439.51,965
Drill Drawing:
  drawing of 510 lines, arcs and shapes, not listed
  text "Layer" at 14498.89,7824.79 h60
  text "Name" at 14908.81,7824.79 h60
  text "Material" at 15838.55,7824.79 h60
  text "Thickness" at 16698.32,7824.79 h60
  text "Constant" at 17348.15,7824.79 h60
  text "Board Layer Stack" at 17918.01,7824.79 h60
  text "Top Overlay" at 14908.81,7704.79 h60
  text "Top Solder" at 14908.81,7584.79 h60
  text "Solder Resist" at 15838.55,7584.79 h60
  text "3.00mil" at 16698.32,7584.79 h60
  text "3.5" at 17348.15,7584.79 h60
  text "1" at 14498.89,7464.79 h60
  text "Top Layer" at 14908.81,7464.79 h60
  text "9.00mil" at 16698.32,7464.79 h60
  text "Dielectric 1" at 14908.81,7344.79 h60
  text "FR-4" at 15838.55,7344.79 h60
  text "16.00mil" at 16698.32,7344.79 h60
  text "4.8" at 17348.15,7344.79 h60
  text "2" at 14498.89,7224.79 h60
  text "Bottom Layer" at 14908.81,7224.79 h60
  text "9.00mil" at 16698.32,7224.79 h60
  text "Bottom Solder" at 14908.81,7104.79 h60
  text "Solder Resist" at 15838.55,7104.79 h60
  text "3.00mil" at 16698.32,7104.79 h60
  text "3.5" at 17348.15,7104.79 h60
  text "Bottom Overlay" at 14908.81,6984.79 h60
  text "Symbol" at 1171.5,896.5 h72
  text "Count" at 1677.38,896.5 h72
  text "Hole Size" at 2207.24,896.5 h72
  text "Plated" at 3296.92,896.5 h72
  text "Hole Type" at 3802.8,896.5 h72
  text "Drill Layer Pair" at 4536.6,896.5 h72
  text "Via/Pad" at 6036.15,896.5 h72
  text "Pad Shape" at 6626,896.5 h72
  text "Template" at 7371.8,896.5 h72
  text "Description" at 8121.59,896.5 h72
  text "Hole Tolerance (+)" at 8975.35,896.5 h72
  text "Hole Tolerance (-)" at 10308.96,896.5 h72
  text "Hole Length" at 11642.57,896.5 h72
  text "Routed Path Length" at 12508.33,896.5 h72
  text "2" at 1677.38,746.5 h60
  text "1.000mm (39.37mil)" at 2207.24,746.5 h60
  text "NPTH" at 3296.92,746.5 h60
  text "Round" at 3802.8,746.5 h60
  text "Top Layer - Bottom Layer" at 4536.6,746.5 h60
  text "Pad" at 6036.15,746.5 h60
  text "Rounded" at 6626,746.5 h60
  text "c0hn100" at 7371.8,746.5 h60
  text "-" at 11642.57,746.5 h60
  text "-" at 12508.33,746.5 h60
  text "13" at 1677.38,596.5 h60
  text "0.300mm (11.81mil)" at 2207.24,596.5 h60
  text "PTH" at 3296.92,596.5 h60
  text "Round" at 3802.8,596.5 h60
  text "Top Layer - Bottom Layer" at 4536.6,596.5 h60
  text "Via" at 6036.15,596.5 h60
  text "Rounded" at 6626,596.5 h60
  text "v60h30m0mx0" at 7371.8,596.5 h60
  text "-" at 11642.57,596.5 h60
  text "-" at 12508.33,596.5 h60
  text "15 Total" at 1677.38,446.5 h60

## Dimensions
70.98,965 to -439.51,965 on Mechanical 1
-123.65,-94.78 to -244.88,1164.05 on Mechanical 1
-125.86,102.06 to -125.86,102.06 on Mechanical 2
-242.67,102.06 to -242.67,102.06 on Mechanical 1
-125.86,967.21 to -125.86,967.21 on Mechanical 1
-242.67,967.21 to -242.67,967.21 on Mechanical 1
70.98,965 to 70.98,104.27 on Mechanical 1
-439.51,965 to -439.51,104.27 on Mechanical 1